# Altium PCB Thunderbolt3.pcbdoc (part 3 of 5)
Units mm, origin at the board's own origin, x right, y up, seen from the top; angles counter-clockwise.
Board outline 43.92 x 41.77 mm, 6 copper layers (TopLayer, MidLayer1, MidLayer2, MidLayer3, MidLayer4, BottomLayer); 211 components, 193 nets, 1132 pads, 744 vias.
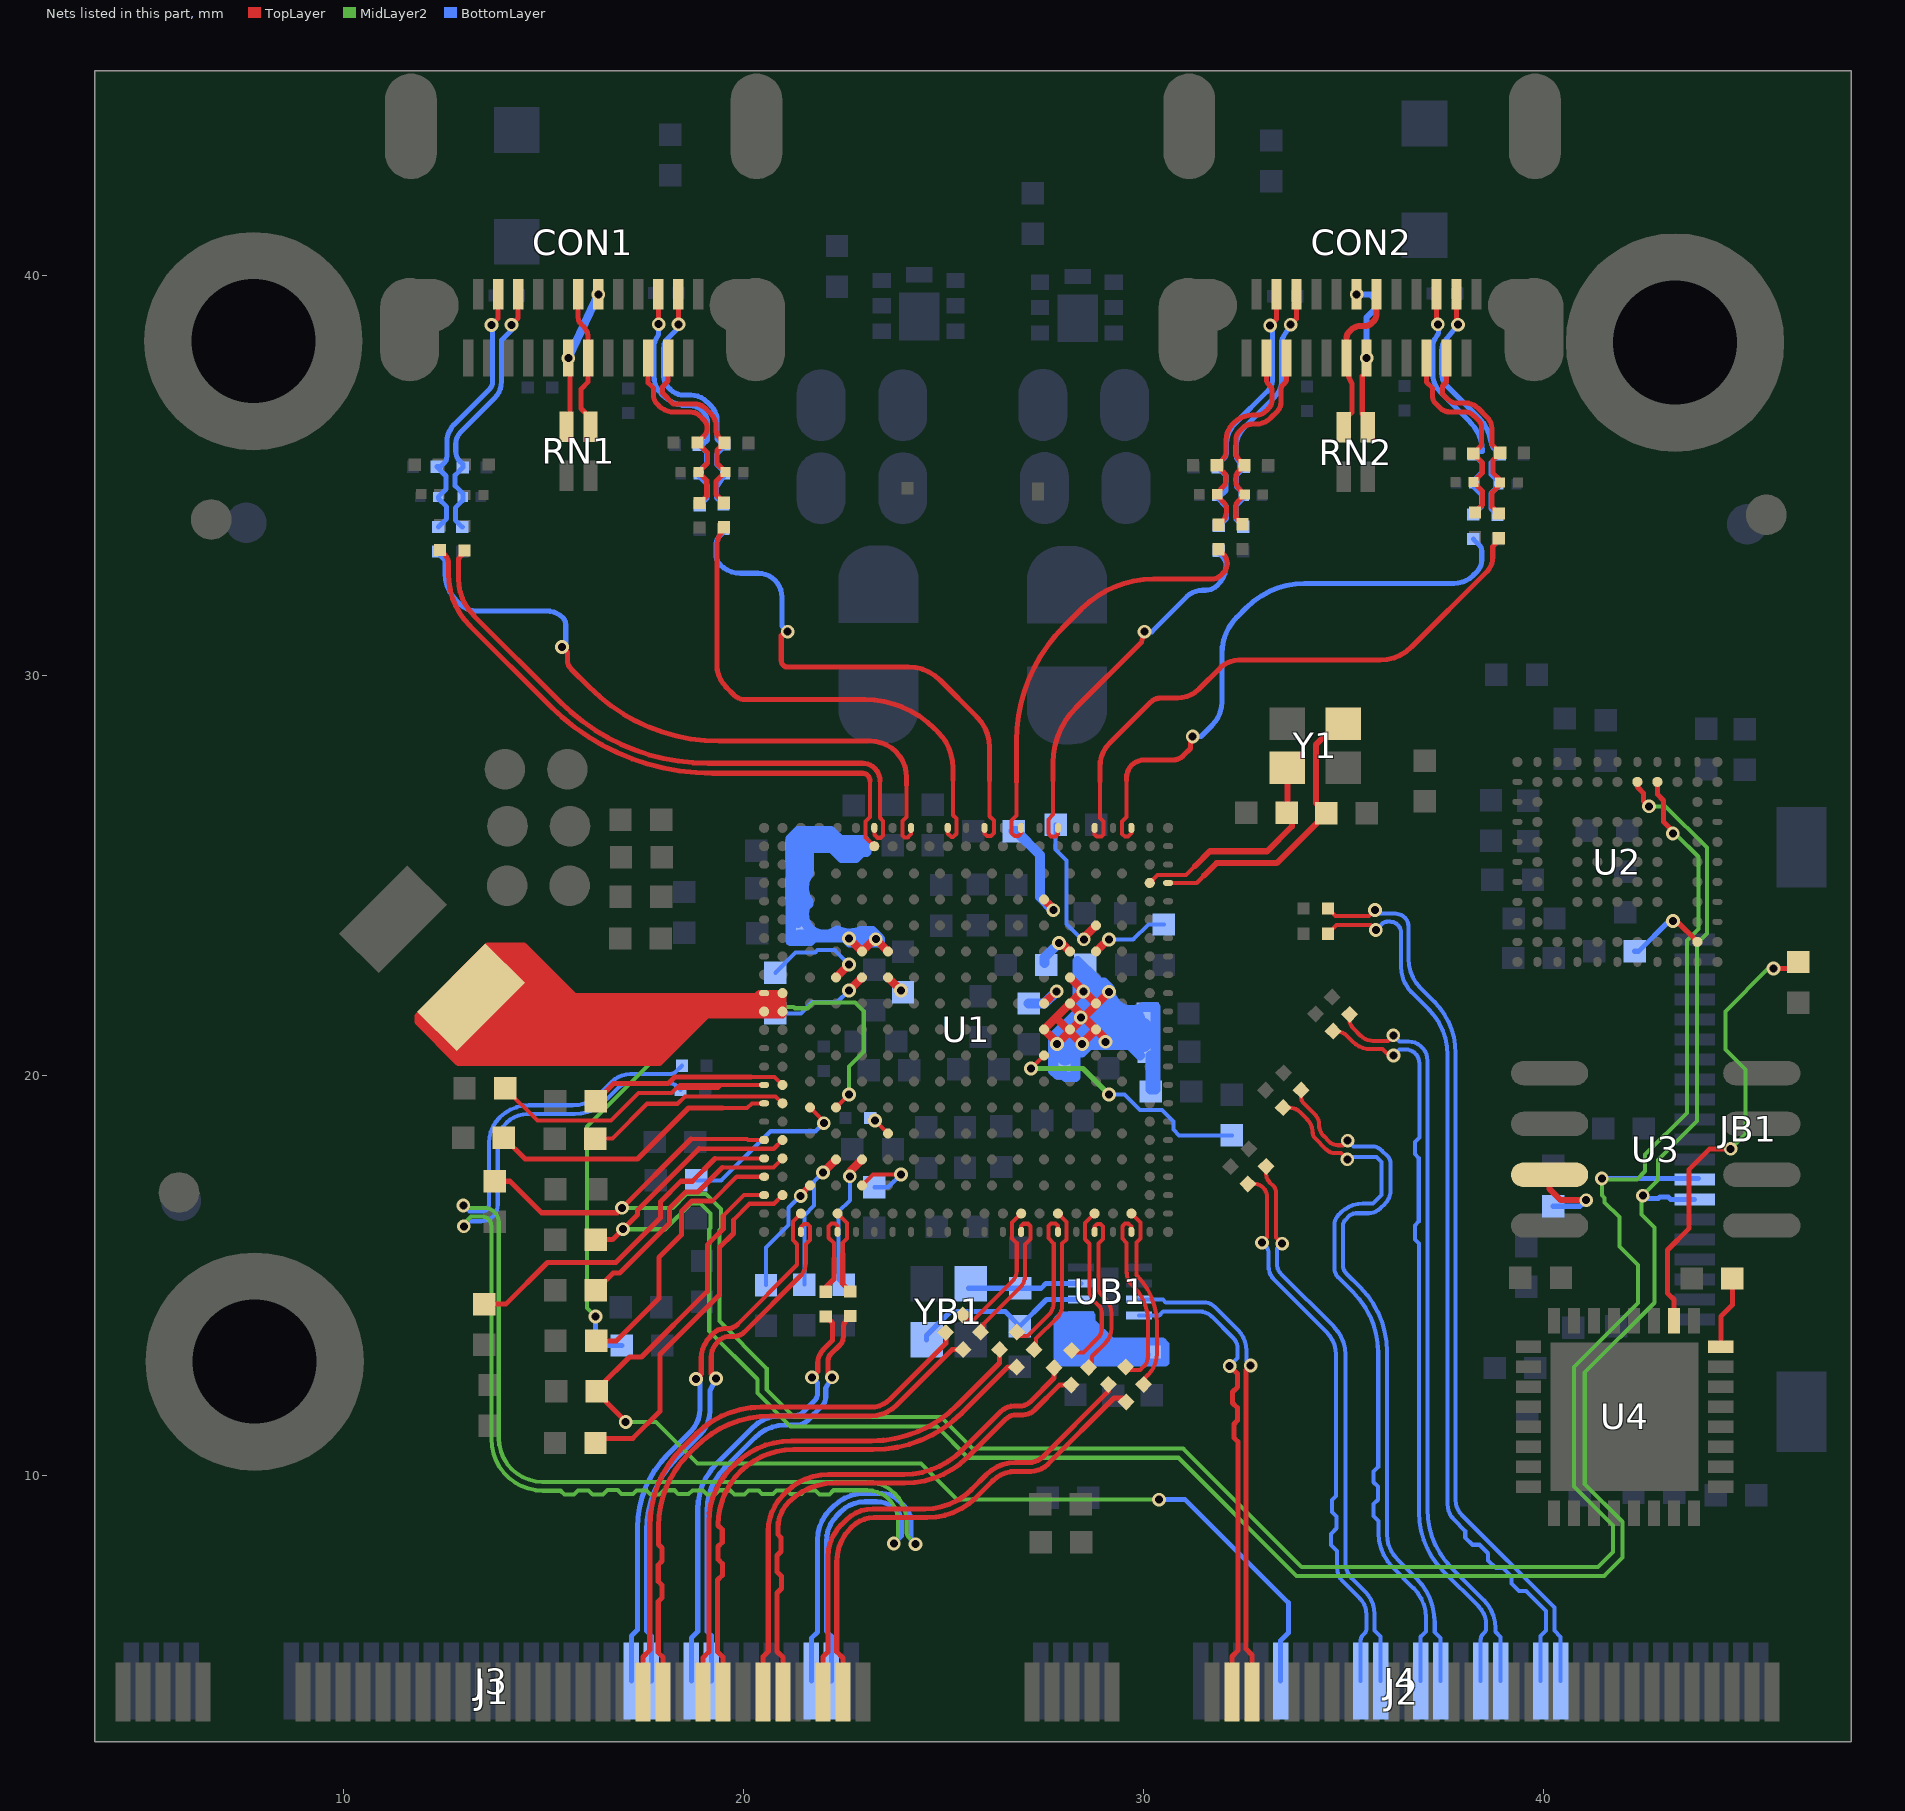
[diagram p7: the nets of this part, all layers, seen from the top]

## Via types
v1: diameter 0.343, hole 0.2, TopLayer to BottomLayer, tented both sides, 632 vias
v2: diameter 0.8, hole 0.8, TopLayer to BottomLayer, 112 vias

## Nets (pads, with @x,y where several pads share a name; then routed paths per layer and width w, separated by ;. In a path a pad name is that pad's centre, name@x,y a point inside that pad or via, vN(x,y) a via of type N, cw(c..) or ccw(c..) an arc to the next point about the centre after c; other vN are vias at no path point) (continued)
NetC3_2: C3.2 CON1.A3 D3.1 R3.2 | length 5.1
  TopLayer w0.127: CON1.A3@17.613,37.946 17.613,37.328 17.74,37.2 17.74,37.032 ccw(c18.082,37.032) 17.84,36.79 17.879,36.752 ccw(c18.263,37.136) 18.263,36.593 18.684,36.593 cw(c18.684,36.281) 18.904,36.501 18.995,36.41 cw(c18.778,36.193) 19.085,36.193 19.085,36.17 cw(c18.858,36.17) 19.019,36.009 R3.2@18.843,35.833 19.095,35.58 19.095,35.321 D3.1@18.868,35.093 19.075,34.885 19.075,34.498 C3.2@18.898,34.321
NetC4_2: C4.2 CON1.A2 D4.1 R4.1 | length 5
  TopLayer w0.127: CON1.A2@18.113,37.946 18.113,37.37 17.97,37.228 17.97,37.069 18.242,36.798 18.767,36.798 cw(c18.767,36.392) 19.054,36.679 19.181,36.552 cw(c18.87,36.24) 19.31,36.24 19.31,36.132 ccw(c19.537,36.132) 19.377,35.972 R4.1@19.523,35.826 19.333,35.636 19.333,35.31 D4.1@19.543,35.101 19.305,34.863 19.305,34.533 C4.2@19.51,34.328
NetC5_2: C5.2 CON2.A11 D5.1 R5.2 | length 5.3
  TopLayer w0.127: C5.2@31.873,33.778 31.981,33.887 ccw(c31.778,34.09) 32.065,34.09 32.065,34.185 ccw(c31.854,34.185) 32.004,34.335 31.838,34.5 31.838,34.58 31.995,34.737 ccw(c31.837,34.895) 32.06,34.895 32.06,34.954 ccw(c31.869,34.954) 32.004,35.089 R5.2@31.828,35.266 31.988,35.426 ccw(c31.818,35.595) 32.058,35.595 32.058,35.894 cw(c32.617,35.894) 32.222,36.289 32.267,36.334 cw(c32.71,35.89) 32.71,36.518 32.814,36.518 ccw(c32.814,36.859) 33.055,36.618 33.122,36.684 ccw(c32.909,36.898) 33.21,36.898 33.21,37.12 ccw(c33.029,37.12) 33.157,37.248 33.118,37.287 cw(c33.229,37.398) 33.073,37.398 CON2.A11@33.073,37.946
NetC6_2: C6.2 CON2.A10 D6.1 R6.1 | length 5.2
  TopLayer w0.127: C6.2@32.473,33.788 32.367,33.894 cw(c32.527,34.054) 32.3,34.054 32.3,34.208 cw(c32.543,34.208) 32.371,34.379 D6.1@32.528,34.536 32.383,34.68 cw(c32.582,34.88) 32.3,34.88 32.3,34.932 cw(c32.581,34.932) 32.383,35.131 R6.1@32.518,35.266 32.378,35.405 cw(c32.553,35.581) 32.305,35.581 32.305,35.916 cw(c32.57,35.916) 32.383,36.103 32.473,36.193 cw(c32.72,35.945) 32.72,36.295 32.808,36.295 ccw(c32.808,36.807) 33.17,36.445 33.342,36.617 ccw(c33.129,36.83) 33.43,36.83 33.43,37.158 cw(c33.587,37.158) 33.476,37.269 33.519,37.312 ccw(c33.391,37.44) 33.573,37.44 CON2.A10@33.573,37.946
NetC7_2: C7.2 CON2.A3 D7.1 R7.2 | length 5.2
  TopLayer w0.127: CON2.A3@37.073,37.946 37.073,37.343 37.215,37.2 37.215,37.004 ccw(c37.484,37.004) 37.294,36.814 37.4,36.709 ; 37.408,36.7 ccw(c37.655,36.948) 37.655,36.598 38.024,36.598 cw(c38.024,36.269) 38.257,36.501 38.381,36.377 cw(c38.219,36.215) 38.448,36.215 38.448,35.763 R7.2@38.24,35.556 38.47,35.325 38.47,35.076 D7.1@38.243,34.848 38.473,34.618 38.473,34.276 C7.2@38.28,34.083
NetC8_2: C8.2 CON2.A2 D8.1 R8.1 | length 5.1
  TopLayer w0.127: 37.468,37.236 37.468,37.044 37.579,36.932 ccw(c37.856,37.209) 37.856,36.817 ; 37.473,37.245 37.573,37.345 CON2.A2@37.573,37.946 ; 37.856,36.818 38.067,36.818 ; 38.052,36.82 cw(c38.052,36.389) 38.357,36.694 38.592,36.459 cw(c38.323,36.19) 38.703,36.19 38.703,35.788 R8.1@38.915,35.576 38.728,35.388 38.728,35.075 38.905,34.898 38.905,34.775 38.708,34.578 38.708,34.225 C8.2@38.878,34.056
NetC12_2: C12.2 U1.D22 Y1.1 | length 5.7
  TopLayer w0.102: U1.D22@30.151,24.823 30.345,25.018 31.058,25.018 31.283,25.243
  TopLayer w0.152: 31.283,25.243 31.655,25.615 33.085,25.615 33.708,26.238 33.708,26.453 33.593,26.568 Y1.1@33.593,27.708
NetC13_1: C13.1 U1.D23 Y1.3 | length 7.2
  TopLayer w0.102: U1.D23@30.61,24.823 31.326,24.823 31.588,25.085
  TopLayer w0.152: 31.512,25.009 31.82,25.318 33.323,25.318 34.56,26.555 C13.1@34.56,26.568 34.305,26.823 34.305,28.283 Y1.3@34.745,28.723
NetC18_2: C18.2 J4.22 | length 22.7
  TopLayer w0.102: C18.2@34.608,24.186 34.796,23.998 35.632,23.998 v1(35.783,24.148)
  BottomLayer w0.102: v1(35.783,24.148) 35.876,24.055 36.296,24.055 cw(c36.296,23.733) 36.618,23.733 36.618,22.927 ccw(c37.648,22.927) 36.92,22.199 37.263,21.856 cw(c35.969,20.563) 37.798,20.563 37.798,9.39 ccw(c38.31,9.39) 37.948,9.028 40.266,6.71 40.266,6.13 40.425,5.971 J4.22@40.425,4.868
NetC19_2: C19.2 J4.24 | length 22.7
  TopLayer w0.102: C19.2@34.608,23.553 34.822,23.768 35.681,23.768 v1(35.803,23.646)
  BottomLayer w0.102: v1(35.803,23.646) 35.953,23.796 cw(c36.096,23.652) 36.096,23.855 36.156,23.855 cw(c36.156,23.578) 36.433,23.578 36.433,22.732 ccw(c37.355,22.732) 36.703,22.08 37.128,21.655 cw(c35.993,20.52) 37.598,20.52 37.598,9.286 ccw(c38.132,9.286) 37.754,8.909 38.038,8.625 38.038,8.458 38.218,8.278 38.398,8.278 38.611,8.065 38.611,7.888 38.803,7.695 38.983,7.695 39.198,7.48 39.198,7.31 39.386,7.123 39.563,7.123 40.061,6.625 40.061,6.135 39.925,6 J4.24@39.925,4.868
NetC20_2: C20.2 J4.30 | length 18.7
  TopLayer w0.102: C20.2@34.735,21.116 34.81,21.116 cw(c34.81,20.743) 35.074,21.006 35.224,20.857 ccw(c35.68,21.314) 35.68,20.668 35.973,20.668 v1@36.108,20.533
  BottomLayer w0.102: v1(36.245,20.508) 36.397,20.66 36.546,20.66 cw(c36.546,20.313) 36.893,20.313 36.893,18.463 36.781,18.35 36.781,18.043 36.876,17.948 36.876,16.36 36.778,16.263 36.778,15.913 36.883,15.808 36.883,9.092 ccw(c38.983,9.092) 37.498,7.608 38.377,6.729 cw(c37.933,6.285) 38.561,6.285 38.561,6.194 cw(c38.394,6.194) 38.512,6.076 38.483,6.048 ccw(c38.623,5.908) 38.425,5.908 J4.30@38.425,4.868
NetC21_2: C21.2 J4.28 | length 18.9
  TopLayer w0.102: C21.2@35.145,21.536 35.145,21.407 ccw(c35.445,21.407) 35.233,21.195 35.426,21.003 ccw(c35.733,21.31) 35.733,20.875 36.102,20.875 v1(36.24,21.013)
  BottomLayer w0.102: v1(36.24,21.013) 36.396,20.858 36.62,20.858 cw(c36.62,20.385) 37.093,20.385 37.093,9.16 ccw(c39.163,9.16) 37.699,7.696 38.501,6.895 cw(c37.794,6.189) 38.793,6.189 38.793,6.103 38.925,5.971 J4.28@38.925,4.868
NetC22_2: C22.2 J4.42 | length 13.9
  TopLayer w0.102: C22.2@32.605,17.298 32.775,17.298 cw(c32.775,17.027) 32.967,17.219 32.993,17.192 cw(c32.772,16.97) 33.085,16.97 33.085,15.958 v1(32.958,15.831)
  BottomLayer w0.102: v1@33.055,15.733 cw(c32.897,15.575) 33.121,15.575 33.121,15.245 ccw(c33.603,15.245) 33.262,14.904 34.573,13.593 cw(c34.01,13.031) 34.806,13.031 34.806,9.495 34.703,9.393 34.703,9.1 34.823,8.98 34.823,8.69 34.683,8.55 34.683,8.273 34.836,8.12 34.836,7.688 ccw(c35.276,7.688) 34.965,7.376 35.4,6.941 cw(c34.995,6.535) 35.568,6.535 35.568,6.189 cw(c35.359,6.189) 35.507,6.041 35.473,6.007 ccw(c35.587,5.893) 35.425,5.893 J4.42@35.425,4.868
NetC23_2: C23.2 J4.40 | length 14
  TopLayer w0.102: C23.2@33.063,17.738 33.063,17.535 ccw(c33.321,17.535) 33.138,17.352 33.247,17.244 cw(c33.093,17.09) 33.31,17.09 33.31,15.955 v1(33.46,15.806)
  BottomLayer w0.102: v1(33.46,15.806) 33.333,15.679 33.333,15.305 ccw(c33.713,15.305) 33.444,15.036 34.752,13.728 cw(c34.057,13.033) 35.041,13.033 35.041,7.828 ccw(c35.59,7.828) 35.201,7.439 35.54,7.101 cw(c34.99,6.55) 35.768,6.55 35.768,6.138 35.925,5.981 J4.40@35.925,4.868
NetC24_2: C24.2 J4.36 | length 17.9
  TopLayer w0.102: C24.2@33.483,19.206 33.64,19.206 cw(c33.64,18.833) 33.904,19.096 34.078,18.923 cw(c33.721,18.566) 34.225,18.566 ccw(c34.379,18.566) 34.27,18.458 34.576,18.152 ccw(c34.768,18.344) 34.768,18.073 34.931,18.073 v1(35.09,17.913)
  BottomLayer w0.102: v1(35.09,17.913) 35.153,17.976 35.815,17.976 35.946,17.845 35.946,17.018 35.736,16.808 35.481,16.808 ccw(c35.481,16.017) 34.922,16.576 34.878,16.532 ccw(c35.142,16.268) 34.768,16.268 34.768,15.193 ccw(c35.101,15.193) 34.866,14.958 35.244,14.579 cw(c33.751,13.085) 35.863,13.085 35.863,10.225 35.746,10.108 35.746,9.84 35.853,9.733 35.853,9.403 35.746,9.295 35.746,9 35.871,8.875 35.871,8.563 ccw(c37.061,8.563) 36.219,7.721 36.751,7.19 cw(c36.021,6.46) 37.053,6.46 37.053,6.105 36.925,5.977 J4.36@36.925,4.868
NetC25_2: C25.2 J4.34 | length 17.9
  TopLayer w0.102: C25.2@33.933,19.641 33.933,19.488 ccw(c34.185,19.488) 34.007,19.309 34.274,19.041 cw(c34.012,18.779) 34.383,18.779 ccw(c34.79,18.779) 34.502,18.491 34.638,18.355 ccw(c34.855,18.573) 34.855,18.265 34.982,18.265 v1(35.098,18.381)
  BottomLayer w0.102: v1(35.098,18.381) 35.246,18.233 35.715,18.233 cw(c35.715,17.9) 35.951,18.135 36.106,17.98 cw(c35.944,17.818) 36.173,17.818 36.173,17.148 cw(c35.684,17.148) 36.03,16.802 35.919,16.691 cw(c35.616,16.994) 35.616,16.565 35.306,16.565 ccw(c35.306,16.322) 35.134,16.494 35.04,16.399 ccw(c35.176,16.263) 34.983,16.263 34.983,15.258 ccw(c35.256,15.258) 35.063,15.065 35.416,14.712 cw(c33.811,13.108) 36.081,13.108 36.081,8.545 ccw(c36.973,8.545) 36.342,7.914 36.818,7.438 cw(c35.712,6.333) 37.276,6.333 37.276,6.093 37.425,5.943 J4.34@37.425,4.868
NetC26_1: C26.1 J3.18 | length 11.1
  TopLayer w0.127: v1(21.705,12.463) 21.85,12.608 21.85,12.824 cw(c22.294,12.824) 21.98,13.138 21.98,13.154 22.217,13.391 22.217,13.821 C26.1@22.053,13.986
  BottomLayer w0.127: J3.18@18.69,4.868 18.69,5.947 18.851,6.108 18.851,9.161 cw(c20.472,9.161) 19.326,10.308 20.234,11.216 cw(c20.921,10.529) 20.921,11.5 21.268,11.5 ccw(c21.268,11.807) 21.486,11.59 21.759,11.864 ccw(c21.551,12.072) 21.846,12.072 21.846,12.323 v1(21.705,12.463)
NetC27_1: C27.1 J3.16 | length 11.1
  TopLayer w0.127: v1(22.208,12.463) 22.11,12.56 22.11,12.89 cw(c22.322,12.89) 22.172,13.04 22.405,13.273 ccw(c22.2,13.478) 22.49,13.478 22.49,13.702 cw(c22.784,13.702) 22.576,13.909 C27.1@22.663,13.996
  BottomLayer w0.127: J3.16@19.19,4.868 19.19,6.003 19.081,6.113 19.081,9.128 cw(c20.6,9.128) 19.526,10.203 20.275,10.952 cw(c21.038,10.189) 21.038,11.268 21.318,11.268 ccw(c21.318,11.66) 21.596,11.383 21.964,11.751 ccw(c21.755,11.96) 22.051,11.96 22.051,12.195 v1(22.208,12.463)
NetC28_1: C28.1 J1.23 | length 14.2
  TopLayer w0.127: J1.23@17.48,4.598 17.48,5.473 17.65,5.643 17.65,8.72 cw(c20.465,8.72) 18.475,10.711 18.807,11.043 cw(c20.435,9.415) 20.435,11.718 23.175,11.718 ccw(c23.175,12.411) 23.665,11.921 25.058,13.314 C28.1@25.058,13.576
NetC29_1: C29.1 J1.21 | length 14.1
  TopLayer w0.127: J1.21@17.98,4.598 17.98,5.463 17.863,5.58 17.863,6.858 17.958,6.953 17.958,7.268 17.863,7.363 17.863,7.775 17.958,7.87 17.958,8.195 17.87,8.283 17.87,8.74 cw(c20.418,8.74) 18.617,10.541 18.8,10.725 cw(c20.666,8.86) 20.666,11.498 23.171,11.498 ccw(c23.171,12.42) 23.823,11.768 25.213,13.158 C29.1@25.485,13.158
NetC30_1: C30.1 J1.17 | length 13.7
  TopLayer w0.127: J1.17@18.98,4.598 18.98,5.453 19.128,5.6 19.128,8.856 cw(c21,8.856) 19.676,10.18 19.793,10.296 cw(c21.19,8.899) 21.19,10.875 23.196,10.875 ccw(c23.196,13.894) 25.331,11.76 26.395,12.824 C30.1@26.395,13.158
NetC31_1: C31.1 J1.15 | length 13.7
  TopLayer w0.127: J1.15@19.48,4.598 19.48,5.468 19.348,5.6 19.348,7.398 19.465,7.515 19.465,7.805 19.355,7.915 19.355,8.233 19.463,8.34 19.463,8.658 19.36,8.76 19.36,8.771 cw(c21.248,8.771) 19.913,10.105 cw(c21.24,8.778) 21.24,10.655 23.237,10.655 ccw(c23.237,13.796) 25.458,11.575 26.603,12.721 C31.1@26.823,12.721
NetC32_1: C32.1 J1.11 | length 13.1
  TopLayer w0.127: J1.11@20.48,4.598 20.48,5.478 20.613,5.61 20.613,8.615 cw(c21.889,8.615) 20.987,9.518 21.075,9.606 cw(c22.118,8.562) 22.118,10.038 24.007,10.038 ccw(c24.007,12.088) 25.457,10.638 26.426,11.607 cw(c26.76,11.273) 26.76,11.745 26.896,11.745 ccw(c26.896,12.14) 27.175,11.861 27.76,12.446 C32.1@27.76,12.703
NetC33_1: C33.1 J1.9 | length 13.1
  TopLayer w0.127: J1.9@20.98,4.598 20.98,5.463 20.833,5.61 20.833,7.07 20.945,7.183 20.945,7.49 20.833,7.603 20.833,8.008 20.935,8.11 20.935,8.455 20.853,8.538 20.853,8.686 cw(c21.788,8.686) 21.127,9.346 cw(c22.264,8.209) 22.264,9.818 24.022,9.818 ccw(c24.022,12.054) 25.603,10.473 26.542,11.412 cw(c26.815,11.139) 26.815,11.525 26.981,11.525 ccw(c26.981,11.935) 27.27,11.645 27.901,12.276 C33.1@28.188,12.276
NetC34_1: C34.1 J1.5 | length 12.4
  TopLayer w0.127: J1.5@21.98,4.598 21.98,5.475 22.105,5.6 22.105,7.972 cw(c23.239,7.972) 22.437,8.773 22.563,8.899 cw(c23.23,8.231) 23.23,9.175 24.537,9.175 ccw(c24.537,10.803) 25.689,9.652 26.07,10.033 cw(c26.793,9.31) 26.793,10.333 27.12,10.333 ccw(c27.12,10.851) 27.486,10.485 C34.1@29.102,12.101 ; C34.1@29.115,12.114 C34.1@29.115,12.288
NetC35_1: C35.1 J1.3 | length 12.4
  TopLayer w0.127: J1.3@22.48,4.598 22.48,5.445 22.325,5.6 22.325,7.852 cw(c23.528,7.852) 22.678,8.702 22.695,8.72 cw(c23.263,8.153) 23.263,8.955 24.583,8.955 ccw(c24.583,10.692) 25.812,9.464 26.225,9.878 cw(c26.793,9.31) 26.793,10.113 27.176,10.113 ccw(c27.176,10.714) 27.602,10.289 29.258,11.945 29.466,11.945 C35.1@29.56,11.851
NetC37_2: C37.2 U4.16 | length 1.8
  TopLayer w0.127: U4.16@44.428,13.228 44.428,13.983 44.715,14.27 C37.2@44.715,14.936
NetC200_2: C200.2 CB51.1 CB52.1 CB53.1 U1.H6 U1.H8 | length 20.2
  TopLayer w0.203: v1(22.633,23.435) U1.H6@22.958,23.11 v1@23.265,23.418 ; v1@23.303,23.415 U1.H8@23.608,23.11
  BottomLayer w0.254: CB51.1@21.361,23.823 21.361,25.973 22.111,25.973 22.421,25.663 C200.2@22.688,25.663 ; CB51.1@21.385,23.53 21.641,23.53 ; 21.511,25.15 21.511,25.864 22.219,25.864 ; 21.618,24.3 21.618,24.363 ; C200.2@22.688,25.75 C200.2@22.911,25.75 ; 22.911,23.458 23.051,23.458 ; 22.999,23.546 v1@23.282,23.546 ; 21.618,24.363 cw(c22.079,24.708) 21.633,25.073 21.633,25.61 21.723,25.7 22.203,25.7 22.451,25.453 22.801,25.453 22.951,25.603 23.068,25.603 23.068,25.835 23.013,25.89 22.411,25.89 22.178,26.123 21.363,26.123 21.176,25.935 21.176,23.378 21.663,23.378 21.746,23.46 22.518,23.46 22.646,23.333 23.346,23.333 23.371,23.333 23.403,23.365 23.403,23.425 23.213,23.615 22.926,23.615 cw(c22.656,24.247) 22.338,23.638 cw(c22.019,24.041) 21.618,24.363
  other v1: 23.303,23.418
NetC206_2: C206.2 C215.2 CB39.2 CB55.2 CB56.2 U1.J18 U1.L18 U1.L19 U1.M16 U1.M18 U1.M19 | length 27.1
  TopLayer w0.203: v1@27.83,20.8 v1(29.13,22.1) ; v1@27.83,20.838 U1.M16@27.508,21.16 v1@28.455,22.108 ; 27.84,21.415 v1(28.46,20.795) ; U1.L18@28.158,21.81 U1.M19@28.808,21.16 ; U1.J18@28.158,22.46 U1.L19@28.808,21.81 ; v1@28.46,20.813 U1.M19@28.808,21.16 ; v1@29.045,20.923 U1.M19@28.808,21.16
  BottomLayer w0.254: CB55.2@29.911,20.508 29.643,20.775 28.641,20.775 28.596,20.73 28.451,20.585 28.296,20.585 28.296,19.978 28.051,19.978 27.993,20.035 27.833,20.035 27.741,20.128 27.741,20.98 28.343,21.583 28.343,22.875 28.343,22.873 28.886,22.33 29.003,22.33 29.158,22.175 ccw(c29.693,22.171) CB39.2@29.983,21.723 ; CB39.2@29.983,21.723 30.293,21.723 30.293,19.66 30.173,19.66 30.173,20.513 CB55.2@30.226,20.513
  BottomLayer w0.432: 28.031,20.48 28.031,20.99 28.538,21.498 C206.2@28.538,22.558 ; 28.216,20.72 28.493,20.998 29.806,20.998 CB55.2@29.996,20.808 ; 28.451,21.24 29.973,21.24 30.051,21.163 CB55.2@30.051,20.87 ; 28.781,22.178 28.781,21.44 29.821,21.44 ; 29.006,21.95 29.006,21.858 29.171,21.693
  other v1: 27.83,20.798 29.045,20.853 28.428,21.46 28.49,22.108
NetC207_1: C207.1 U1.H18 | length 1
  TopLayer w0.203: v1@27.945,23.323 U1.H18@28.158,23.11
  BottomLayer w0.254: C207.1@27.521,22.818 27.521,22.96 v1(27.883,23.323)
NetC208_2: C208.2 U1.J8 | length 0.5
  TopLayer w0.203: U1.J8@23.608,22.46 v1(23.933,22.135)
NetC214_1: C214.1 U1.L16 | length 1.3
  TopLayer w0.203: U1.L16@27.508,21.81 v1@27.813,22.115
  BottomLayer w0.254: C214.1@27.125,21.808 27.516,21.808 v1(27.823,22.115)
NetC218_1: C218.1 U1.V8 | length 0.5
  TopLayer w0.102: v1(23.283,18.885) U1.V8@23.608,18.56
NetC219_2: C219.2 UB1.3 YB1.1 | length 2.9
  BottomLayer w0.127: YB1.1@25.623,14.691 27.436,14.691 27.554,14.808 UB1.3@28.433,14.808
NetC220_1: C220.1 CB70.2 LB1.2 UB1.1 | length 13.1
  BottomLayer w0.203: UB1.1@28.278,14.008 28.696,14.008 28.696,13.853 29.191,13.358 30.468,13.358 30.538,13.288 30.538,12.838 27.963,12.838 27.843,12.958 27.843,13.908 27.944,14.008 UB1.1@28.433,14.008
  BottomLayer w0.406: C220.1@28.273,13.205 28.273,13.44 28.331,13.498 28.821,13.498 ; C220.1@28.411,13.258 29.896,13.258 ; 28.613,13.645 28.456,13.803 28.001,13.803 28.001,13.14 28.116,13.025 LB1.2@29.968,13.025
NetCB13_2: CB13.2 CON2.B11 DB3.1 RB5.2 | length 6.4
  TopLayer w0.127: v1@37.823,38.813 CON2.B11@37.823,39.538
  BottomLayer w0.127: v1(37.855,38.781) 37.533,38.38 ccw(c37.831,38.14) 37.448,38.14 37.448,37.556 ccw(c37.866,37.556) 37.571,37.26 38.382,36.449 cw(c37.645,35.712) 38.671,35.896 38.673,35.886 ccw(c39.173,35.974) 38.798,35.631 38.886,35.535 38.688,35.338 38.688,35.035 38.868,34.855 DB3.1@38.868,34.79 ; CB13.2@38.843,34.02 38.678,34.185 38.678,34.558 DB3.1@38.868,34.747
NetCB14_2: CB14.2 CON2.B10 DB4.1 RB6.1 | length 6.5
  TopLayer w0.127: CON2.B10@37.323,39.538 37.323,38.818 v1(37.353,38.788)
  BottomLayer w0.127: 37.334,38.503 37.276,38.415 ccw(c37.537,38.245) 37.226,38.245 37.226,37.564 ccw(c37.904,37.564) 37.424,37.084 38.162,36.346 cw(c37.424,35.608) 38.468,35.608 38.315,35.608 RB6.1@38.245,35.538 38.453,35.33 38.453,35.093 38.265,34.905 38.265,34.703 38.443,34.525 38.443,34.235 CB14.2@38.24,34.033 ; 37.334,38.503 ccw(c37.117,38.645) 37.376,38.645 37.376,38.765 v1(37.353,38.788)
NetCB15_2: CB15.2 CON2.B3 DB5.1 RB7.2 | length 6.6
  TopLayer w0.127: v1(33.675,38.778) 33.823,38.926 CON2.B3@33.823,39.538
  BottomLayer w0.127: RB7.2@32.448,35.148 32.318,35.018 32.318,34.733 32.503,34.548 32.503,34.443 32.303,34.243 32.303,33.913 CB15.2@32.488,33.728 ; RB7.2@32.503,35.22 32.503,35.235 32.383,35.355 cw(c32.558,35.53) 32.311,35.53 32.311,35.716 cw(c33.02,35.716) 32.519,36.218 33.286,36.985 ccw(c32.893,37.378) 33.448,37.378 33.448,38.321 cw(c33.748,38.321) 33.492,38.477 v1(33.675,38.778)
NetCB16_2: CB16.2 CON2.B2 DB6.1 RB8.1 | length 6.8
  TopLayer w0.127: v1(33.163,38.758) 33.323,38.918 CON2.B2@33.323,39.538
  BottomLayer w0.127: CB16.2@31.878,33.743 32.068,33.933 32.068,34.22 31.838,34.45 31.873,34.45 32.056,34.633 32.056,35.005 RB8.1@31.848,35.213 31.848,35.278 32.002,35.431 ccw(c31.83,35.603) 32.073,35.603 32.073,35.802 cw(c32.786,35.802) 32.282,36.306 33.089,37.113 ccw(c32.764,37.438) 33.223,37.438 33.223,38.405 33.223,38.698 v1(33.163,38.758)
NetCB19_2: CB19.2 CON1.B11 DB7.1 RB9.2 | length 6.5
  TopLayer w0.127: v1(18.37,38.788) CON1.B11@18.37,39.465
  BottomLayer w0.127: 18.083,38.418 v1@18.37,38.705 ; 18.096,38.428 ccw(c18.331,38.192) 17.998,38.192 17.998,37.476 ccw(c18.357,37.476) 18.103,37.223 18.169,37.158 ccw(c18.506,37.495) 18.506,37.018 18.681,37.018 cw(c18.681,36.45) 19.082,36.852 19.188,36.745 cw(c18.838,36.395) 19.333,36.395 19.333,35.922 19.518,35.737 19.318,35.538 19.318,35.295 19.535,35.078 DB7.1@19.535,35.04 19.321,34.708 19.321,34.46 CB19.2@19.498,34.283
NetCB20_2: CB20.2 CON1.B10 DB8.1 RB10.1 | length 6.6
  TopLayer w0.127: v1(17.875,38.793) CON1.B10@17.875,39.526
  BottomLayer w0.127: v1(17.875,38.793) 17.875,38.54 17.803,38.414 ccw(c18.119,38.234) 17.756,38.234 17.756,37.499 ccw(c18.392,37.499) 17.942,37.049 ; 17.933,37.058 17.979,37.011 ccw(c18.598,37.63) 18.598,36.755 18.656,36.755 cw(c18.656,36.313) 19.098,36.313 19.098,35.898 18.976,35.775 RB10.1@18.878,35.775 19.073,35.58 19.073,35.31 18.878,35.115 18.878,34.988 19.078,34.788 19.078,34.433 CB20.2@18.903,34.258
NetCB21_2: CB21.2 CON1.B3 DB9.1 RB3.2 | length 6.8
  TopLayer w0.127: v1(14.193,38.776) 14.363,38.946 CON1.B3@14.363,39.538
  BottomLayer w0.127: CB21.2@12.965,33.718 12.791,33.892 12.791,34.2 12.978,34.387 12.978,34.558 12.786,34.75 12.786,35.018 RB3.2@12.978,35.21 12.978,35.29 12.897,35.371 cw(c13.129,35.604) 12.801,35.604 12.801,35.804 cw(c13.202,35.804) 12.918,36.088 13.772,36.941 ccw(c13.358,37.355) 13.943,37.355 13.943,38.391 14.193,38.64 v1(14.193,38.776)
NetCB22_2: CB22.2 CON1.B2 DB10.1 RB4.1 | length 6.9
  TopLayer w0.127: v1(13.695,38.771) 13.863,38.938 CON1.B2@13.863,39.538
  BottomLayer w0.127: CB22.2@12.365,33.723 12.573,33.93 12.573,34.225 12.365,34.433 DB10.1@12.365,34.475 12.558,34.668 12.558,34.997 RB4.1@12.328,35.228 12.421,35.228 12.504,35.311 ccw(c12.326,35.49) 12.578,35.49 12.578,35.839 cw(c13.21,35.839) 12.763,36.285 13.648,37.17 ccw(c13.473,37.345) 13.721,37.345 13.721,38.64 13.773,38.693 v1(13.695,38.771)
NetCB30_1: CB30.1 U1.E16 | length 2.7
  TopLayer w0.203: U1.E16@27.508,24.41 v1@27.74,24.178
  BottomLayer w0.254: CB30.1@26.753,26.118 26.81,26.118 27.408,25.52 27.408,24.475 v1(27.74,24.143)
NetCB35_1: CB35.1 U2.B10 | length 2
  TopLayer w0.127: v1(43.23,23.873) 43.32,23.873 U2.B10@43.843,23.351
  BottomLayer w0.127: CB35.1@42.275,23.115 42.373,23.115 v1@43.131,23.873
NetCB66_2: CB66.2 J3.6 | length 34.1
  MidLayer2 w0.102: v1(12.99,16.761) 13.051,16.7 13.513,16.7 cw(c13.513,16.338) 13.876,16.338 13.876,10.948 ccw(c14.973,10.948) 14.973,9.85 23.076,9.85 cw(c23.076,8.858) 24.068,8.858 24.068,8.606 ccw(c24.282,8.606) 24.131,8.455 v1(24.295,8.291)
  BottomLayer w0.102: v1(12.99,16.761) 13.141,16.61 13.456,16.61 ccw(c13.456,16.788) 13.633,16.788 13.633,18.325 cw(c14.514,18.325) 13.891,18.948 13.911,18.968 cw(c14.628,18.251) 14.628,19.265 15.722,19.265 ccw(c15.722,20.208) 16.389,19.541 16.698,19.85 cw(c17.163,19.385) 17.163,20.043 18.151,20.043 ccw(c18.151,20.271) 18.312,20.11 CB66.2@18.455,20.253
  BottomLayer w0.127: J3.6@21.69,4.868 21.69,5.94 21.848,6.098 21.848,8.403 cw(c22.91,8.403) 22.159,9.154 22.246,9.24 cw(c23.012,8.474) 23.012,9.558 23.461,9.558 cw(c23.461,8.984) 23.866,9.39 24.019,9.236 cw(c23.63,8.847) 24.181,8.847 24.181,8.405 v1(24.295,8.291)
NetCB67_2: CB67.2 J3.4 | length 33.8
  MidLayer2 w0.102: v1@13.043,16.348 13.183,16.488 13.447,16.488 cw(c13.447,16.244) 13.691,16.244 13.691,10.923 ccw(c14.986,10.923) 14.986,9.628 15.426,9.628 15.516,9.538 15.761,9.538 15.858,9.635 16.121,9.635 16.226,9.53 16.481,9.53 16.593,9.643 16.851,9.643 16.943,9.55 17.231,9.55 17.318,9.638 17.568,9.638 17.673,9.533 17.898,9.533 18.006,9.64 18.266,9.64 18.363,9.543 18.623,9.543 18.716,9.635 18.986,9.635 19.086,9.535 19.278,9.535 19.383,9.64 19.658,9.64 19.768,9.53 20.018,9.53 20.121,9.633 20.376,9.633 20.461,9.548 20.728,9.548 20.816,9.635 21.078,9.635 21.171,9.543 21.446,9.543 21.538,9.635 21.791,9.635 21.891,9.535 22.141,9.535 22.246,9.64 23.083,9.64 cw(c23.083,8.863) 23.861,8.863 23.861,8.416 v1(23.753,8.308)
  BottomLayer w0.102: v1(13.003,16.238) 13.13,16.365 13.436,16.365 ccw(c13.436,16.78) 13.851,16.78 13.851,18.3 cw(c14.596,18.3) 14.596,19.045 15.772,19.045 ccw(c15.772,20.087) 16.508,19.35 16.855,19.698 cw(c17.146,19.407) 17.146,19.818 18.141,19.818 ; 18.141,19.818 cw(c18.141,19.547) 18.332,19.738 CB67.2@18.423,19.648
  BottomLayer w0.127: J3.4@22.19,4.868 22.19,5.993 22.066,6.118 22.066,8.358 cw(c23,8.358) 22.339,9.019 ; 22.33,9.01 22.419,9.098 cw(c23.033,8.484) 23.033,9.353 23.32,9.353 cw(c23.32,8.657) 23.812,9.149 cw(c23.483,8.82) 23.948,8.82 23.948,8.504 v1(23.753,8.308)
NetCB72_2: CB72.2 UB1.2 YB1.3 | length 4.6
  BottomLayer w0.127: YB1.3@24.573,13.401 24.573,13.51 25.171,14.108 26.538,14.108 CB72.2@26.903,13.743 27.568,14.408 UB1.2@28.433,14.408
NetCON1_A6: CON1.A6 CON1.B6 RN1.1 | length 3.6
  TopLayer w0.127: CON1.B6@15.863,39.538 15.863,38.959 ccw(c16.09,38.959) 15.929,38.799 15.991,38.738 cw(c15.696,38.443) 16.113,38.443 16.113,37.35 15.93,37.168 15.93,36.685 16.173,36.443 RN1.1@16.173,36.233
NetCON1_A7: CON1.A7 CON1.B7 RN1.2 | length 3.5
  TopLayer w0.127: RN1.2@15.573,36.233 15.662,36.322 15.662,37.897 CON1.A7@15.613,37.946
  BottomLayer w0.203: v1(15.615,37.943) v1(16.365,39.536)
NetCON2_A6: CON2.A6 CON2.B6 RN2.1 | length 3.6
  TopLayer w0.127: CON2.A6@35.563,37.595 35.463,37.496 35.463,36.552 35.6,36.415 RN2.1@35.6,36.211
  BottomLayer w0.152: v1(35.323,39.538) 35.668,39.538 35.788,39.418 35.788,39.178 35.573,38.962 v1(35.573,37.946)
NetCON2_A7: CON2.A7 CON2.B7 RN2.2 | length 3.6
  TopLayer w0.127: RN2.2@35,36.211 35,36.38 35.208,36.588 35.208,37.3 CON2.A7@35.053,37.628
  TopLayer w0.152: CON2.A7@35.073,37.946 35.073,38.458 cw(c35.266,38.458) 35.129,38.594 35.184,38.649 cw(c35.423,38.41) 35.423,38.748 35.517,38.748 ccw(c35.517,39.021) 35.71,38.828 ; 35.739,38.857 ccw(c35.538,39.058) 35.823,39.058 CON2.B7@35.823,39.538
NetJ2_53: J2.53 UB1.7 | length 12
  TopLayer w0.127: v1(32.673,12.761) 32.555,12.643 32.555,5.677 32.708,5.524 J2.53@32.708,4.598
  BottomLayer w0.102: UB1.7@29.883,14.408 30.48,14.408 30.551,14.338 31.495,14.338 cw(c31.495,13.932) 31.782,14.219 32.356,13.645 cw(c31.843,13.132) 32.568,13.132 32.568,12.865 v1(32.673,12.761)
NetJ2_55: J2.55 UB1.8 | length 11.9
  TopLayer w0.127: v1(32.148,12.748) 32.343,12.553 32.343,12.218 32.223,12.098 32.223,11.823 32.34,11.705 32.34,11.383 32.255,11.298 32.255,10.95 32.353,10.853 32.353,5.63 32.208,5.485 J2.55@32.208,4.598
  BottomLayer w0.102: UB1.8@29.883,14.008 30.389,14.008 30.488,14.108 31.396,14.108 cw(c31.396,13.668) 31.707,13.979 32.239,13.447 cw(c31.974,13.183) 32.348,13.183 32.348,12.949 v1(32.148,12.748)
NetL3_2: L3.2 U1.K1 U1.K2 U1.L1 U1.L2 | length 54.9
  TopLayer w0.203: 11.868,21.49 11.868,21.353 12.87,20.35 17.888,20.35 19.07,21.533 20.969,21.533 20.969,22.05 20.398,22.05 20.32,21.973 15.758,21.973 14.498,23.233 13.61,23.233 L3.2@11.93,21.553
  TopLayer w0.432: 18.848,21.84 15.68,21.84 14.508,23.013 13.63,23.013 12.033,21.415 12.915,20.533 17.753,20.533 18.933,21.713 20.753,21.713
  TopLayer w0.483: L3.2@12.478,21.455 13.065,20.868 17.718,20.868 18.428,21.578 ; 20.63,21.89 20.76,21.89
  TopLayer w0.787: L3.2@12.785,21.658 13.638,22.51 14.505,22.51 15.595,21.42 17.828,21.42 ; L3.2@12.84,21.458 15.65,21.458 ; L3.2@13.713,21.903 14.843,21.903
NetR10_1: R10.1 U4.18 | length 11.5
  TopLayer w0.127: U4.18@43.255,13.876 43.255,14.408 43.095,14.568 43.095,15.648 43.628,16.18 43.628,17.653 44.151,18.176 v1(44.673,18.176) ; v1(45.743,22.683) 46.196,22.683 R10.1@46.423,22.91
  MidLayer2 w0.102: v1(44.673,18.176) 45.041,18.544 45.041,20.163 44.541,20.663 44.541,21.613 45.611,22.683 v1(45.743,22.683)
NetR11_2: R11.2 U1.T1 | length 7.3
  TopLayer w0.102: 19.465,19.195 20.085,19.195 20.204,19.314 U1.T1@20.51,19.314
  TopLayer w0.127: R11.2@14.003,18.456 14.538,17.92 17.345,17.92 18.62,19.195 19.465,19.195
NetR12_2: R12.2 U1.R1 | length 8.3
  TopLayer w0.102: R12.2@14.035,19.688 14.843,18.88 16.68,18.88 17.368,19.568 18.2,19.568 18.406,19.773 U1.R1@20.51,19.773 ; 18.325,19.693 19.355,19.693 19.435,19.773
NetR14_2: R14.2 U1.R2 | length 5
  TopLayer w0.102: 20.175,19.973 20.77,19.973 U1.R2@20.969,19.773
  TopLayer w0.127: R14.2@16.305,19.368 16.742,19.805 18.108,19.805 18.275,19.973 20.175,19.973
NetR15_2: R15.2 U1.T2 | length 5.2
  TopLayer w0.102: R15.2@16.29,18.431 16.716,18.431 17.588,19.303 18.348,19.303 18.53,19.485 20.798,19.485 U1.T2@20.969,19.314
NetR18_2: R18.2 U1.W1 | length 8.7
  TopLayer w0.102: 19.285,17.937 U1.W1@20.51,17.937
  TopLayer w0.127: R18.2@13.518,14.293 14.051,14.293 15.093,15.335 16.803,15.335 17.918,16.45 17.918,16.855 18.428,17.365 18.713,17.365 19.285,17.937
NetR20_2: R20.2 U1.AA2 | length 8.9
  TopLayer w0.102: 19.743,16.4 20.145,16.803 20.753,16.803 U1.AA2@20.969,17.019
  TopLayer w0.127: R20.2@16.273,10.938 17.228,10.938 17.905,11.615 17.905,13.038 19.398,14.53 19.398,15.715 19.743,16.06 19.743,16.4
NetR21_2: R21.2 U1.W2 | length 6.2
  TopLayer w0.102: 19.465,17.708 20.74,17.708 U1.W2@20.969,17.937
  TopLayer w0.127: R21.2@16.305,14.643 16.73,15.068 16.898,15.068 18.148,16.318 18.148,16.693 18.553,17.098 18.855,17.098 19.465,17.708
NetR22_2: R22.2 U1.Y1 | length 6.8
  TopLayer w0.102: 19.218,16.87 19.825,17.478 U1.Y1@20.51,17.478
  TopLayer w0.127: R22.2@16.31,13.376 16.818,13.376 17.88,14.438 17.88,15.463 18.44,16.023 18.44,16.608 18.703,16.87 19.218,16.87
NetR816_1: R816.1 U1.J6 | length 2.5
  TopLayer w0.203: v1(22.633,22.135) U1.J6@22.958,22.46
  BottomLayer w0.102: R816.1@20.79,21.563 21.431,21.563 21.708,21.84 22.338,21.84 v1(22.633,22.135)
NetR816_2: R816.2 U1.J5 | length 2.7
  TopLayer w0.203: U1.J5@22.308,22.46 v1(22.633,22.785)
  BottomLayer w0.102: R816.2@20.79,22.578 21.295,23.083 21.788,23.083 21.848,23.143 22.275,23.143 v1(22.633,22.785)
NetRB12_2: RB12.2 U1.F19 | length 3.5
  TopLayer w0.203: v1@28.558,23.51 U1.F19@28.808,23.76
  BottomLayer w0.102: RB12.2@27.798,26.28 27.798,25.658 28.071,25.385 28.071,23.8 28.458,23.413 v1(28.503,23.413)
NetRB15_2: RB15.2 U1.H19 | length 2
  TopLayer w0.203: U1.H19@28.808,23.11 v1@29.105,23.408
  BottomLayer w0.102: v1(29.13,23.408) 29.738,23.408 30.116,23.785 RB15.2@30.505,23.785
NetRB18_1: RB18.1 U3.7 | length 2.3
  TopLayer w0.152: U3.7@40.148,17.528 40.148,17.168 40.422,16.893 v1(41.063,16.893)
  BottomLayer w0.127: RB18.1@40.235,16.741 40.91,16.741 v1(41.063,16.893)
NetRB19_2: RB19.2 U1.N16 | length 6.3
  TopLayer w0.102: v1(27.183,20.185) U1.N16@27.508,20.51
  MidLayer2 w0.127: v1(27.183,20.185) 28.483,20.185 v1(29.133,19.535)
  BottomLayer w0.102: v1(29.133,19.535) 29.518,19.535 29.906,19.148 30.453,19.148 30.743,18.858 30.743,18.655 30.885,18.513 RB19.2@32.203,18.513
NetRB21_2: RB21.2 U1.Y6 | length 1.9
  TopLayer w0.102: U1.Y6@22.958,17.26 23.233,17.535 v1(23.93,17.535)
  BottomLayer w0.102: RB21.2@23.265,17.215 23.61,17.215 v1(23.93,17.535)
NetRB24_2: RB24.2 U1.T4 | length 4.4
  TopLayer w0.102: U1.T4@21.658,19.21 v1@22.083,18.785
  BottomLayer w0.102: RB24.2@18.813,17.388 19.438,17.388 20.666,18.615 21.8,18.615 v1(22.003,18.818)
NetRB26_2: RB26.2 U1.W6 | length 3.3
  TopLayer w0.203: v1@22.653,17.605 U1.W6@22.958,17.91
  BottomLayer w0.102: RB26.2@22.5,14.775 22.371,14.905 22.371,16.608 22.653,16.89 v1(22.653,17.49)
NetRB27_2: RB27.2 U1.W5 | length 3.5
  TopLayer w0.203: v1(21.983,17.585) U1.W5@22.308,17.91
  BottomLayer w0.102: RB27.2@21.515,14.78 21.515,16.512 21.758,16.755 21.758,17.36 v1(21.983,17.585)
NetRB28_2: RB28.2 U1.Y4 | length 2.9
  TopLayer w0.152: v1@21.423,17.025 U1.Y4@21.658,17.26
  BottomLayer w0.102: RB28.2@20.558,14.768 20.558,15.707 21.123,16.273 21.123,16.703 v1@21.423,17.003
  other v1: 21.423,16.995
NetRB31_1: RB31.1 U1.T5 | length 17.1
  TopLayer w0.102: U1.T5@22.308,19.21 v1(22.633,19.535)
  MidLayer2 w0.102: v1(16.295,13.986) 16.083,14.198 16.083,18.73 19.076,21.723 21.251,21.723 21.283,21.69 21.601,21.69 21.741,21.83 22.788,21.83 23.001,21.618 23.001,20.598 22.633,20.23 v1(22.633,19.535)
  BottomLayer w0.127: v1(16.295,13.986) 16.295,13.416 16.453,13.258 RB31.1@16.95,13.258
SCL: JB1.7 R17.2 U1.V2 U2.E2 | length 60.7
  TopLayer w0.102: 18.885,18.178 20.751,18.178 U1.V2@20.969,18.396
  TopLayer w0.127: R17.2@16.305,15.906 16.72,15.906 17.345,16.531 17.345,16.638 18.885,18.178 ; U2.E2@42.343,27.351 42.343,27.22 42.498,27.065 42.498,26.87 v1(42.63,26.738)
  MidLayer2 w0.102: v1(16.98,16.166) 18.039,16.166 18.681,16.808 18.921,16.808 19.168,16.56 19.168,16.193 19.138,16.163 19.138,13.618 20.341,12.415 20.341,12.068 21.173,11.235 24.828,11.235 25.611,10.453 30.866,10.453 33.821,7.498 41.513,7.498 41.971,7.955 41.971,8.853 41.026,9.798 41.026,12.588 42.766,14.328 42.766,16.208 42.443,16.53 42.443,16.985 42.858,17.4 42.858,17.9 43.828,18.87 43.828,23.308 44.083,23.563 44.083,25.705 43.05,26.738 v1(42.63,26.738)
  BottomLayer w0.127: v1(42.478,17.006) 42.546,16.938 42.871,16.938 42.906,16.973 43.113,16.973 43.176,16.91 JB1.7@43.773,16.911
SDA: JB1.8 R13.2 U1.V1 U2.D2 | length 63.7
  TopLayer w0.102: 18.685,18.423 20.085,18.423 20.112,18.396 U1.V1@20.51,18.396
  TopLayer w0.127: R13.2@13.775,17.366 14.155,17.366 14.943,16.578 16.84,16.578 18.685,18.423 ; U2.D2@42.843,27.351 42.843,27.038 42.998,26.883 42.998,26.353 v1@43.228,26.123
  MidLayer2 w0.102: v1(16.955,16.701) 18.226,16.701 18.568,17.043 19.061,17.043 19.428,16.675 19.428,16.188 19.391,16.15 19.391,13.873 20.576,12.688 20.576,12.155 21.256,11.475 24.931,11.475 25.718,10.688 30.988,10.688 33.951,7.725 41.358,7.725 41.731,8.098 41.731,8.758 40.758,9.73 40.758,12.725 42.358,14.325 42.358,15.273 41.893,15.738 41.893,16.468 41.523,16.838 41.523,16.945 41.453,17.016 41.453,17.41 42.331,17.41 42.536,17.615 42.536,18.03 43.581,19.075 43.581,23.385 43.868,23.673 43.868,25.478 v1@43.308,26.038
  BottomLayer w0.127: v1(41.453,17.436) JB1.8@43.873,17.436
  other v1: 43.228,26.058
U1-A7: C2.1 U1.A7 | length 15.3
  TopLayer w0.102: U1.A7@23.265,26.201 23.265,26.028 23.34,25.953 23.425,25.953 23.485,26.013 23.485,26.375 23.408,26.453 23.408,27.373
  TopLayer w0.127: C2.1@13.018,33.088 12.916,32.986 ccw(c13.031,32.87) 12.868,32.87 12.868,32.437 ccw(c14.184,32.437) 13.253,31.506 15.416,29.344 ccw(c19.105,33.033) 19.105,27.815 22.965,27.815 cw(c22.965,27.373) 23.408,27.373
U1-A9: CB22.1 U1.A9 | length 16.9
  TopLayer w0.102: 24.073,27.273 24.073,26.475 23.973,26.375 23.973,26.013 24.025,25.96 24.1,25.96 24.183,26.043 U1.A9@24.183,26.201
  TopLayer w0.127: v1(15.455,30.721) 15.593,30.583 15.593,30.394 ccw(c15.904,30.394) 15.684,30.174 16.144,29.714 ccw(c19.388,32.957) 19.388,28.37 23.163,28.37 cw(c23.163,27.46) 24.073,27.46 24.073,27.273
  BottomLayer w0.127: CB22.1@12.365,33.108 12.365,33.063 12.492,32.936 cw(c12.381,32.825) 12.538,32.825 12.538,32.557 ccw(c13.49,32.557) 12.817,31.884 12.912,31.789 ccw(c13.313,32.19) 13.313,31.623 15.071,31.623 cw(c15.071,31.045) 15.48,31.453 cw(c15.309,31.283) 15.551,31.283 15.551,30.816 v1(15.455,30.721)
U1-A11: C4.1 U1.A11 | length 13
  TopLayer w0.102: U1.A11@25.101,26.201 25.101,26.065 25.195,25.97 25.233,25.97 25.315,26.053 25.315,26.43 25.23,26.515 25.23,27.533
  TopLayer w0.127: C4.1@19.51,33.713 19.419,33.56 ccw(c19.983,33.226) 19.328,33.226 19.328,30.286 ccw(c20.136,30.286) 19.565,29.715 19.756,29.523 ccw(c20.04,29.807) 20.04,29.405 23.033,29.405 cw(c23.033,26.958) 24.763,28.689 24.862,28.59 cw(c23.972,27.7) 25.23,27.7 25.23,27.398
U1-A13: CB19.1 U1.A13 | length 13.5
  TopLayer w0.102: U1.A13@26.019,26.201 26.019,26.061 26.083,25.998 26.18,25.998 26.258,26.075 26.258,26.38 26.148,26.49 26.148,27.38
  TopLayer w0.127: v1@21.033,31.103 20.938,31.008 20.938,30.383 ccw(c21.1,30.383) 21.1,30.22 24.124,30.22 cw(c24.124,29.117) 24.905,29.897 25.836,28.966 cw(c25.083,28.213) 26.148,28.213 26.148,27.38
  BottomLayer w0.127: 19.415,32.776 cw(c19.683,33.045) 19.303,33.045 19.303,33.27 cw(c19.61,33.27) 19.393,33.488 19.498,33.592 CB19.1@19.498,33.668 ; 19.415,32.776 ccw(c19.923,33.284) 19.923,32.565 ; 19.923,32.565 20.358,32.565 cw(c20.358,31.968) 20.956,31.968 20.956,31.245 v1(21.098,31.103)
U1-A15: C5.1 U1.A15 | length 11.2
  TopLayer w0.102: 26.82,27.463 26.82,26.513 26.693,26.385 26.693,26.075 26.775,25.993 26.865,25.993 26.937,26.065 U1.A15@26.937,26.201
  TopLayer w0.127: 26.82,27.353 26.82,28.372 cw(c30.866,28.372) 28.005,31.233 28.443,31.67 cw(c30.248,29.865) 30.248,32.418 31.7,32.418 ccw(c31.7,32.738) 31.927,32.511 31.998,32.583 ccw(c31.78,32.8) 32.088,32.8 ; C5.1@31.873,33.163 31.998,33.038 cw(c31.781,32.821) 32.088,32.821
U1-A17: CB16.1 U1.A17 | length 9.6
  TopLayer w0.102: 27.735,27.39 27.735,26.53 27.615,26.41 27.615,26.053 27.685,25.983 27.793,25.983 27.856,26.045 U1.A17@27.856,26.201
  TopLayer w0.127: 27.735,27.39 27.735,27.821 cw(c29.694,27.821) 28.309,29.206 29.938,30.835 v1(30.02,31.103)
  BottomLayer w0.127: v1(30.02,31.103) 30.201,31.103 31.077,31.979 cw(c31.466,31.591) 31.466,32.14 31.545,32.14 ccw(c31.545,32.558) 31.841,32.263 31.862,32.284 ccw(c31.388,32.758) 32.058,32.758 ccw(c31.738,32.758) 31.964,32.984 CB16.1@31.878,33.07
U1-A19: C8.1 U1.A19 | length 14.9
  TopLayer w0.102: U1.A19@28.774,26.201 28.774,26.037 28.825,25.985 28.945,25.985 28.998,26.038 28.998,26.355 28.903,26.45 28.903,27.523
  TopLayer w0.127: 28.903,27.355 28.903,27.725 cw(c29.745,27.725) 29.15,28.321 ; 29.15,28.321 30.165,29.336 cw(c30.428,29.074) 30.428,29.445 30.84,29.445 ccw(c30.84,30.216) 31.385,29.671 31.918,30.204 cw(c32.373,29.749) 32.373,30.393 35.904,30.393 ccw(c35.904,31.509) 36.693,30.72 38.578,32.604 ccw(c38.222,32.96) 38.725,32.96 38.725,33.228 C8.1@38.878,33.38
U1-A21: CB14.1 U1.A21 | length 14.9
  TopLayer w0.102: 29.57,27.388 29.57,26.47 29.463,26.363 29.463,26.05 29.528,25.985 29.608,25.985 29.692,26.069 U1.A21@29.692,26.201
  TopLayer w0.127: 29.57,27.388 29.57,27.453 cw(c30.015,27.453) 30.015,27.898 30.735,27.898 ccw(c30.735,28.248) 30.983,28 31.168,28.185 31.168,28.426 v1(31.225,28.483)
  BottomLayer w0.127: v1(31.225,28.483) 31.431,28.483 31.709,28.761 ccw(c31.12,29.35) 31.953,29.35 31.953,30.548 cw(c33.263,30.548) 32.337,31.474 32.572,31.709 cw(c34.023,30.258) 34.023,32.31 37.755,32.31 ccw(c37.755,32.989) 38.234,32.509 38.331,32.605 ccw(c38.041,32.895) 38.451,32.895 38.451,33.124 ccw(c38.25,33.124) 38.392,33.266 CB14.1@38.24,33.418
U1-AA1: J4.50 R23.2 U1.AA1 | length 28.7
  TopLayer w0.102: 19.488,16.498 20.009,17.019 U1.AA1@20.51,17.019
  TopLayer w0.127: v1@17.123,11.29 16.41,12.003 16.41,12.238 17.143,12.97 17.448,12.97 19.09,14.613 19.09,15.775 19.488,16.173 19.488,16.498
  MidLayer2 w0.102: v1(17.05,11.348) 17.808,11.348 18.843,10.312 24.428,10.312 25.335,9.406 v1(30.38,9.406)
  BottomLayer w0.127: v1(30.38,9.406) 31.038,9.406 33.616,6.828 33.616,6.073 33.425,5.882 J4.50@33.425,4.868
U1-AB3: J3.24 U1.AB3 | length 13.6
  TopLayer w0.102: 19.847,13.789 21.335,15.278 21.335,15.385 21.335,15.79 21.23,15.895 21.23,16.362 U1.AB3@21.428,16.56
  TopLayer w0.127: v1(18.805,12.421) 18.938,12.553 18.938,12.935 cw(c19.71,12.935) 19.164,13.481 19.253,13.57 cw(c19.518,13.305) 19.518,13.68 19.584,13.68 ccw(c19.584,14.052) 19.847,13.789
  BottomLayer w0.127: J3.24@17.19,4.868 17.19,5.997 17.346,6.153 17.346,8.708 cw(c19.928,8.708) 18.102,10.534 18.672,11.104 ccw(c18.101,11.675) 18.908,11.675 18.908,12.318 v1(18.805,12.421)
U1-AB5: C27.2 U1.AB5 | length 2.2
  TopLayer w0.102: U1.AB5@22.347,16.56 22.585,16.321 22.585,15.93 22.475,15.82 22.475,15.55
  TopLayer w0.127: 22.475,15.55 22.475,14.798 C27.2@22.663,14.611
U1-AB15: C28.2 U1.AB15 | length 3.5
  TopLayer w0.102: C28.2@25.48,14.023 25.59,13.913 25.763,13.913 26.719,14.869 ccw(c26.463,15.125) 26.825,15.125 26.825,15.818 26.713,15.93 26.713,16.335 U1.AB15@26.937,16.56
U1-AB17: C31.2 U1.AB17 | length 3.7
  TopLayer w0.102: C31.2@27.313,13.223 27.313,13.43 27.83,13.947 ccw(c27.514,14.263) 27.96,14.263 27.96,15.805 28.068,15.913 28.068,16.347 U1.AB17@27.856,16.56
U1-AB19: C32.2 U1.AB19 | length 4.1
  TopLayer w0.102: C32.2@28.253,13.088 28.495,13.088 28.86,13.453 ccw(c28.643,13.67) 28.95,13.67 28.95,14.08 ccw(c28.691,14.08) 28.874,14.264 28.737,14.402 cw(c28.963,14.628) 28.643,14.628 28.643,15.803 28.53,15.915 28.53,16.316 U1.AB19@28.774,16.56
U1-AB21: C35.2 U1.AB21 | length 4.5
  TopLayer w0.102: U1.AB21@29.692,16.56 29.915,16.336 29.915,15.93 29.815,15.83 29.815,15.025 29.825,15.016 cw(c28.604,13.795) 30.33,13.795 30.33,13.053 cw(c29.588,13.053) 30.113,12.528 C35.2@30.003,12.418
U1-AC3: J3.22 U1.AC3 | length 13.7
  TopLayer w0.102: 21.423,15 ccw(c21.109,15.314) 21.553,15.314 21.553,15.423 ; U1.AC3@21.428,16.101 21.428,16.223 21.503,16.298 21.595,16.298 21.658,16.235 21.658,15.898 21.553,15.793 21.553,15.343
  TopLayer w0.127: v1(19.308,12.433) 19.188,12.553 19.188,12.968 cw(c19.725,12.968) 19.345,13.348 19.364,13.366 cw(c19.657,13.074) 19.657,13.488 19.762,13.488 ccw(c19.762,13.846) 20.015,13.593 21.423,15
  BottomLayer w0.127: J3.22@17.69,4.868 17.69,6.001 17.573,6.118 17.573,8.632 cw(c20.134,8.632) 18.323,10.443 18.906,11.025 ccw(c18.308,11.623) 19.153,11.623 19.153,12.115 v1(19.308,12.433)
U1-AC5: C26.2 U1.AC5 | length 2.1
  TopLayer w0.102: 22.258,15.438 22.258,15.818 22.123,15.953 22.123,16.235 22.193,16.305 22.283,16.305 22.347,16.242 U1.AC5@22.347,16.101
  TopLayer w0.127: C26.2@22.048,14.71 22.258,14.92 22.258,15.438
U1-AC15: C29.2 U1.AC15 | length 3.6
  TopLayer w0.102: C29.2@25.92,13.593 25.998,13.671 25.998,13.8 26.924,14.727 ccw(c26.668,14.983) 27.03,14.983 27.03,15.788 27.165,15.923 27.165,16.24 27.103,16.303 26.995,16.303 26.937,16.245 U1.AC15@26.937,16.101
U1-AC17: C30.2 U1.AC17 | length 3.8
  TopLayer w0.102: C30.2@26.83,13.593 26.93,13.493 27.098,13.493 27.609,14.004 ccw(c27.268,14.345) 27.75,14.345 27.75,15.808 27.615,15.943 27.615,16.245 27.678,16.308 27.8,16.308 27.856,16.253 U1.AC17@27.856,16.101
U1-AC19: C33.2 U1.AC19 | length 4.2
  TopLayer w0.102: C33.2@28.703,12.768 28.703,12.99 29.052,13.339 ccw(c28.711,13.68) 29.193,13.68 29.193,14.068 ccw(c28.698,14.068) 29.048,14.418 28.945,14.52 cw(c29.126,14.701) 28.87,14.701 28.87,15.813 28.98,15.923 28.98,16.238 28.923,16.295 28.838,16.295 28.774,16.231 U1.AC19@28.774,16.101
U1-AC21: C34.2 U1.AC21 | length 4.7
  TopLayer w0.102: C34.2@29.55,12.723 29.63,12.643 29.913,12.643 29.999,12.729 ccw(c29.743,12.985) 30.105,12.985 30.105,13.875 ccw(c28.898,13.875) 29.752,14.729 29.696,14.785 cw(c29.986,15.075) 29.575,15.075 29.575,15.82 29.465,15.93 29.465,16.24 29.535,16.31 29.613,16.31 29.692,16.231 U1.AC21@29.692,16.101
U1-B7: C1.1 U1.B7 | length 15.3
  TopLayer w0.102: 23.158,27.373 23.158,26.47 23.048,26.36 23.048,25.958 U1.B7@23.265,25.742
  TopLayer w0.127: C1.1@12.408,33.148 12.528,33.028 cw(c12.31,32.81) 12.618,32.81 12.618,32.544 ccw(c14.445,32.544) 13.153,31.253 15.161,29.245 ccw(c19.215,33.299) 19.215,27.565 22.965,27.565 cw(c22.965,27.373) 23.158,27.373